# Altium PCB BOARD_2LAYER.PcbDoc (part 5 of 7)
Units mil, origin at the board's own origin, x right, y up, seen from the top; angles counter-clockwise.
Board outline 7677.17 x 7677.17 mil, 2 copper layers (Top Layer, Bottom Layer), stack 34.252 mil thick; 625 components, 375 nets, 1924 pads, 450 vias.
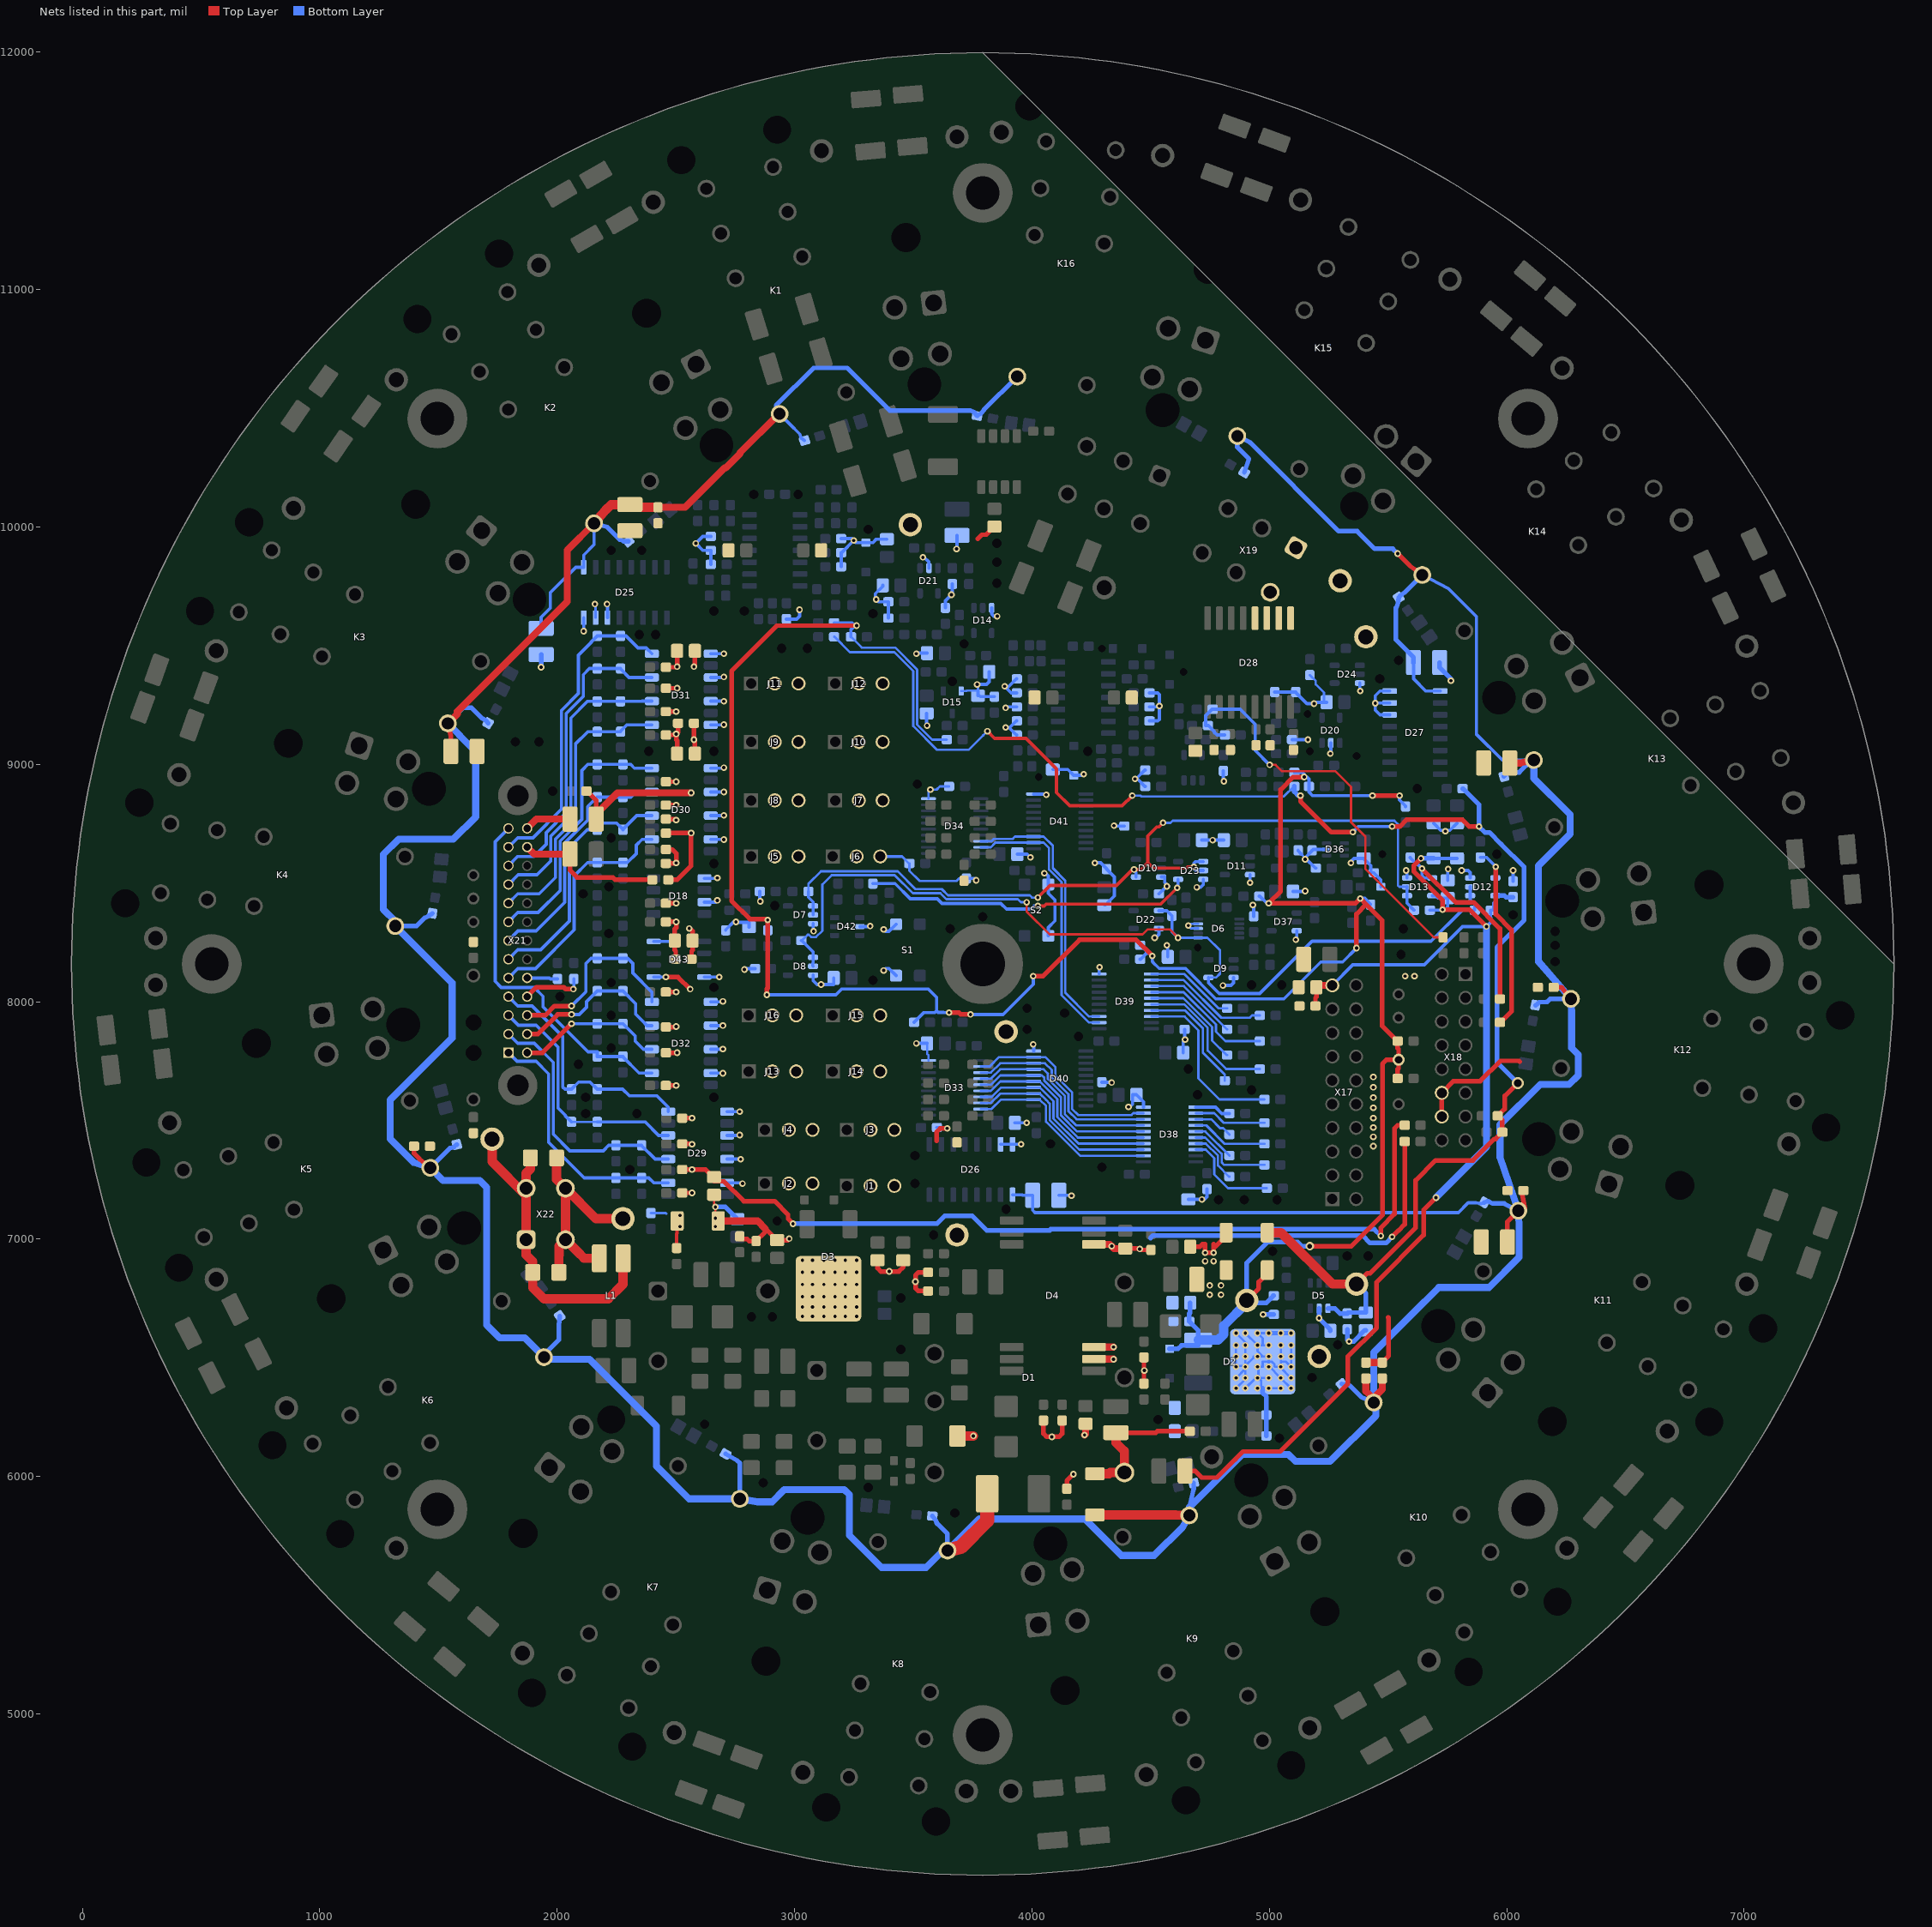
[diagram p5: the nets of this part, all layers, seen from the top]

## Via types
v1: diameter 27.56/27.56 (per signal layer), hole 13.78, Top Layer to Bottom Layer, 447 vias
v2: diameter 78.74, hole 55.12, Top Layer to Bottom Layer, 2 vias
v3: diameter 35.43/35.43 (per signal layer), hole 19.68, Top Layer to Bottom Layer, 1 vias

## Nets (pads, with @x,y where several pads share a name; then routed paths per layer and width w, separated by ;. In a path a pad name is that pad's centre, name@x,y a point inside that pad or via, vN(x,y) a via of type N, cw(c..) or ccw(c..) an arc to the next point about the centre after c; other vN are vias at no path point) (continued)
+5V_COM: C11.2 C50.2 D2.3 FB1.2 FB4.1 FB7.1 FB8.1 FB9.1 FB10.2 FB11.1 FB12.1 FB13.1 FB15.1 FB17.1 FB18.1 KW8.1 R143.2 R168.1 R189.1 TP8.1 V6.2 V13.1 | length 11333.2
  Top Layer w19.68: v1(2883.01,8029.53) 2883.01,8054.13 2886.95,8058.07 v1(2886.95,8344.49) 2886.95,8348.43 2811.08,8348.43 2734.6,8424.9 2734.6,9393.2 2926.05,9584.65 v1(3260.97,9584.65) ; v1(3650.73,7954.72) 3692.07,7954.72 3699.94,7946.85 v1(3741.28,7946.85) ; v1(4005.06,8108.27) 4046.79,8108.27 4200,8261.48 4438.46,8261.48 v1(4507.03,8192.91) ; TP8.1@4904.67,6742.13 4954.89,6792.35 4954.89,6819.91 4991.28,6856.3 V13.1@4991.28,6870.08 ; v1(5146.79,8946.85) 5100.8,8946.85 5047.06,8893.11 5047.06,8465.23 4997.97,8416.13 4997.19,8416.13 v1(4997.19,8415.35) 5360.86,8415.35 5360.9,8415.39 5363.37,8415.39 v1(5383.01,8435.04) 5407.91,8410.14 ; v3(5170.42,6970.47) 5345.4,6970.47 5476.2,7101.27 5476.2,7738.3 5493.8,7755.91 KW8.1@5544.43,7755.91 ; v1(5367.27,8226.38) 5367.27,8369.5 5407.91,8410.14 ; v1(5434.2,8868.11) v1(5548.37,8868.11) ; R189.1@5540.5,7677.17 5540.5,7715.55 5544.43,7719.49 KW8.1@5544.43,7755.91 ; 5407.91,8410.14 5474.4,8343.65 5474.4,7898.77 5538.53,7834.65 R168.1@5540.5,7834.65 5540.5,7804.13 5544.43,7800.2 KW8.1@5544.43,7755.91
  Bottom Layer w9.84: FB18.1@3237.35,9537.4 3282.81,9491.93 3424.16,9491.93 3515.13,9400.97 3515.13,9399.66 3515.89,9398.9 3515.89,9167.8 3579.36,9104.33 FB10.2@3640.89,9104.33
  Bottom Layer w13.78: v1(2883.01,8029.53) 3174.07,8029.53 3198.2,8053.65 3562.86,8053.65 3598.2,8018.31 3598.2,7962.08 ; FB9.1@2886.95,8301.18 v1(2886.95,8344.49) ; FB15.1@3166.48,9596.46 3242.27,9596.46 v1@3254.08,9584.65 ; FB18.1@3237.35,9537.4 3237.35,9567.91 v1@3254.08,9584.65 ; v1(3260.97,9584.65) v1@3254.08,9584.65 ; FB8.1@3503.09,7913.39 3544.43,7954.72 3590.85,7954.72 3598.2,7962.08 ; v1(3650.73,7954.72) 3626.13,7954.72 3625.73,7955.12 3605.16,7955.12 3598.2,7962.08 ; v1(3741.28,7946.85) 3878.2,7946.85 4005.06,8073.71 v1(4005.06,8108.27) ; FB7.1@4455.85,8179.13 4457.82,8179.13 4482.85,8204.17 ; FB1.2@4455.85,8238.19 4457.82,8238.19 4482.85,8213.15 4482.85,8204.17 ; FB11.1@4957.82,8444.88 4959.79,8444.88 4989.31,8415.35 v1(4997.19,8415.35) ; FB13.1@5105.46,8966.54 5137.94,8966.54 5146.79,8957.68 v1(5146.79,8946.85) 5157.62,8946.85 5166.48,8937.99 FB17.1@5166.48,8907.48 5166.48,8884.27 5182.63,8868.11 v1(5434.2,8868.11) ; v1(5367.27,8226.38) 5308.74,8167.85 5216.82,8167.85 5061.32,8012.35 4774.42,8012.35 4646.54,8140.23 4535.57,8140.23 4509.76,8166.04 4509.76,8166.34 4507.03,8169.07 v1(4507.03,8192.91) 4495.78,8204.17 4482.85,8204.17 ; v1(5383.01,8435.04) 5384.43,8436.45 5401.29,8436.45 5426.32,8411.42 FB12.1@5426.32,8409.45 ; v1(5548.37,8868.11) 5548.37,8850.39 5573.96,8824.8 R143.2@5573.96,8822.83
  Bottom Layer w19.68: V6.2@4579.87,6538.39 4615.74,6538.39 4630.06,6552.71 4699.94,6552.71 D2.3@4699.94,6574.8 4699.94,6616.14 C11.2@4662.54,6653.54 4662.54,6686.02 4666.48,6689.96 C50.2@4666.48,6732.28 ; FB4.1@5018.84,6761.81 5016.87,6761.81 4987.35,6732.28 4904.67,6732.28 TP8.1@4904.67,6742.13 4904.67,6899.99 4993.02,6988.35 5119.08,6988.35 5136.95,6970.47 v3(5170.42,6970.47)
  Bottom Layer w39.37: D2.3@4699.94,6574.8 4784.59,6574.8 4808.21,6598.43 4808.21,6635.83 TP8.1@4904.67,6732.28
+5V_IND: C33.2 C35.2 C61.2 C86.1 D12.5 D13.5 H21.1 H22.1 L6.2 R96.2 R97.2 X17.19 | length 4995.3
  Top Layer w19.68: L6.2@4644.83,6023.62 4687.15,6023.62 4715.29,5995.48 4779.37,5995.48 4856.88,6072.99 4889.65,6105.76 5045.35,6105.76 5331.13,6391.54 5331.13,6505.98 5451.61,6626.47 5451.61,6818.74 5650.03,7017.16 5650.03,7123.31 v1(5701.91,7175.2) ; C35.2@5194.04,7982.28 5194.04,8016.73 5197.98,8020.67 C86.1@5197.98,8061.02 ; v1(5638.92,8604.33) 5609.09,8574.5 5609.09,8548.54 5729.47,8428.16 v1(5729.47,8387.8) 5843.64,8387.8 v1(5914.51,8316.93)
  Top Layer w29.53: C86.1@5197.98,8061.02 5205.85,8068.9 X17.19@5265.3,8068.9
  Bottom Layer w13.78: X17.19@5265.3,8068.9 5351.81,8155.41 5652.46,8155.41 5813.56,8316.51 5889.48,8316.51 5889.9,8316.93 v1(5914.51,8316.93) 5932.31,8334.73 5932.31,8355.23 5932.23,8355.32 R96.2@5932.23,8385.83 5945.05,8385.83 5945.05,8416.34 5951.91,8423.2 D12.5@5951.91,8446.85 ; R97.2@5676.32,8385.83 v1@5729.47,8385.83 ; D13.5@5686.16,8446.85 5700.93,8446.85 5710.77,8437.01 C61.2@5751.13,8437.01 5751.13,8400.59 5736.36,8385.83 v1@5729.47,8385.83 ; H22.1@5692.07,8604.33 H21.1@5790.5,8604.33 ; v1(5729.47,8387.8) v1@5729.47,8385.83
  Bottom Layer w19.68: v1(5638.92,8604.33) H22.1@5692.07,8604.33 ; D12.5@5951.91,8446.85 5990.3,8446.85 5996.2,8440.94 C33.2@6026.72,8440.94
  Bottom Layer w29.53: v1(5701.91,7175.2) 5914.51,7387.8 v1(5914.51,8316.93)
+5V_R: C8.2 C21.2 C22.2 C23.2 C24.2 C95.2 C96.2 C97.2 C100.2 C101.2 C102.2 C103.2 D25.9 D26.9 D27.9 K1.A1 K2.A1 K3.A1 K4.A1 K5.A1 K6.A1 K7.A1 K8.A1 K9.A1 K10.A1 K11.A1 K12.A1 K13.A1 K14.A1 K15.A1 K16.A1 L8.2 R85.2 R126.2 R127.2 R128.2 R129.2 R130.2 R131.2 R132.2 R133.2 R134.2 R135.2 R136.2 R137.2 R138.2 R139.2 R140.2 R141.2 V16.1 | length 24526.5
  Top Layer w9.84: K10.A1@5439.63,6311.95 K10.A1@5439.63,6326.51
  Top Layer w19.68: C21.2@1396.79,7391.73 1396.79,7361.22 1420.59,7337.42 K5.A1@1465.29,7300.65 ; K3.A1@1539.4,9172.9 1552.31,9119.09 C102.2@1552.31,9055.12 ; v1(5540.5,9887.8) 5592.64,9835.65 K14.A1@5644.03,9797.89 ; C100.2@6003.09,6988.19 6003.09,7073.85 K11.A1@6049.01,7119.76 6076.96,7129.93 6061.87,7204.72 C24.2@6070.02,7204.72 ; C23.2@6197.98,8061.02 6230.46,8061.02 6234,8057.48 K12.A1@6270.29,8012.39
  Top Layer w29.53: K3.A1@1539.4,9172.9 1579.15,9212.65 1579.15,9222.85 2041.79,9685.49 2041.79,9901.97 K2.A1@2155.12,10015.3 ; C22.2@2424.35,10082.68 2539.37,10082.68 2705.55,10248.86 2710.03,10248.86 2770.01,10308.84 2770.01,10313.32 2932.1,10475.41 K1.A1@2936.84,10476.44 ; R85.2@5406.64,6413.39 5406.64,6359.5 5439.63,6326.51 5439.63,6331.77 5475.53,6367.67 C8.2@5475.53,6413.39 ; C101.2@6012.94,9005.91 6057.59,9005.91 K13.A1@6114.13,9018.25
  Top Layer w39.37: K2.A1@2155.12,10015.3 2205.06,10072.04 2227.5,10094.49 C96.2@2306.24,10094.49 2306.24,10084.65 2304.27,10082.68 C22.2@2424.35,10082.68 ; V16.1@4264.9,5838.58 4604.76,5838.58 K9.A1@4662.6,5836.5
  Top Layer w59.06: K8.A1@3644.15,5688.18 3700.1,5702.97 3811.16,5814.03 L8.2@3811.16,5927.17
  Bottom Layer w13.78: C95.2@1932.23,9572.83 1932.23,9619.99 1970.77,9658.53 1970.77,9723.51 2077.97,9830.71 D25.9@2111.56,9830.71 2111.56,9881.89 2155.12,9925.45 K2.A1@2155.12,10015.3 ; K1.A1@2936.84,10476.44 2977.76,10435.51 3022.28,10390.99 3027.4,10374.77 R126.2@3042.04,10363.95 ; D26.9@3918.25,7187.01 3958.8,7187.01 3960.77,7185.04 C103.2@4003.09,7185.04 4003.09,7121.81 4012.84,7112.06 5796.23,7112.06 5837.75,7153.59 5869.83,7153.59 5891.28,7149.67 R136.2@5905.65,7154.97 ; C97.2@5607.42,9429.13 5607.42,9360.24 5658.8,9308.86 D27.9@5719.63,9308.86 ; K14.A1@5644.03,9797.89 5754.44,9740.84 5872.05,9623.23 5872.05,9127.57 5981.38,9018.25 6104.56,9018.25 K13.A1@6114.13,9018.25
  Bottom Layer w19.68: K4.A1@1317.5,8319.1 1406.75,8319.1 1440.94,8353.29 1456.82,8360.23 R129.2@1473.66,8372.56 ; K5.A1@1465.29,7300.65 1548,7383.36 1564.42,7387.76 R130.2@1576.72,7398.78 ; K3.A1@1539.4,9172.9 1605.49,9238.99 1637.88,9238.99 1682.14,9194.74 1698.46,9185.31 R128.2@1708.8,9173.77 ; K6.A1@1944.12,6503.06 1944.12,6513.66 2006.39,6575.93 2006.39,6638.58 2008.65,6654.35 R131.2@2010.48,6675.34 ; K2.A1@2155.12,10015.3 2210.84,9999.66 2263.44,9947.06 2279.34,9940.15 R127.2@2300.29,9939.12 ; R132.2@2709.24,6095.47 2759,6066.89 2769.49,6056.4 K7.A1@2769.49,5906.06 ; K1.A1@2936.84,10476.44 2922.09,10491.19 2922.09,10512.16 3080.02,10670.09 3221.09,10670.09 3400.44,10490.74 3739.69,10490.74 3755.24,10483.81 R141.2@3769.35,10468.41 3786.93,10479.82 3796.81,10492.26 K16.A1@3938.02,10633.47 ; R133.2@3579.74,5833.7 3593.68,5818.11 3600.18,5802.03 3644.15,5758.06 K8.A1@3644.15,5688.18 ; K9.A1@4662.6,5836.5 4662.6,5870.08 4664.29,5871.77 4677.5,5933.08 4682.13,5950.12 R134.2@4681.09,5973.23 ; R140.2@4894.28,10229.33 4914.1,10287.24 4864.97,10336.36 K15.A1@4864.97,10382.99 4916.86,10357.36 5291.87,9982.34 5369.72,9982.34 5443.39,9908.67 5519.62,9908.67 v1(5540.5,9887.8) ; R135.2@5304.32,6389.62 5325.27,6388.59 5341.17,6381.68 5386.95,6335.91 K10.A1@5439.63,6311.95 ; C97.2@5607.42,9429.13 5607.42,9450.79 5533.07,9525.14 5533.07,9658.89 5535.41,9661.22 5542.2,9681.78 R139.2@5544.92,9702.61 5551.22,9710.7 5569.98,9723.83 K14.A1@5644.03,9797.89 ; R136.2@5905.65,7154.97 5920.03,7160.26 5941.47,7149.87 5990.11,7149.87 5991.87,7148.1 K11.A1@6049.01,7119.76 ; R138.2@5988.53,8949.65 6000.4,8962.23 6016.83,8966.63 6052.94,8966.63 K13.A1@6104.56,9018.25 ; R137.2@6121.11,7985.71 6137.95,7998.04 6169.75,8000.05 6175.69,8004.98 6183.1,8012.39 K12.A1@6270.29,8012.39
  Bottom Layer w29.53: K3.A1@1539.4,9172.9 1587.85,9124.45 1587.85,9122.82 1656.73,9053.93 1656.73,8779.43 1562.52,8685.21 1331.95,8685.21 1267.78,8621.03 1267.78,8388.96 1317.5,8339.24 K4.A1@1317.5,8319.1 1557.01,8079.6 1557.01,7847.21 1296.23,7586.43 1296.23,7422.55 1393.5,7325.27 1393.5,7324.34 K5.A1@1465.29,7300.65 1518.13,7247.8 1673.83,7247.8 1703.05,7218.58 1703.05,6638.31 1757.35,6584.01 1863.17,6584.01 K6.A1@1944.12,6503.06 1945.27,6500.93 1952.17,6494.02 2135.95,6494.02 2417.48,6212.49 2417.48,6043.71 2555.13,5906.06 K7.A1@2769.49,5906.06 2844.05,5893.58 2905.13,5893.58 2956.6,5945.05 3209.34,5945.05 3230.22,5924.17 3230.22,5752.73 3365.91,5617.04 3554.16,5617.04 3625.31,5688.18 K8.A1@3644.15,5688.18 3777.51,5821.54 4222.74,5821.54 4376.35,5667.93 4515.35,5667.93 4633.75,5786.33 K9.A1@4662.6,5836.5 ; K9.A1@4664.29,5871.77 4885.59,6093.07 5080.92,6093.07 5110.15,6063.84 5256.09,6063.84 5448.57,6256.32 5448.57,6303.02 K10.A1@5439.63,6311.95 5439.63,6522.6 5598.48,6681.46 5713.67,6796.64 5925.77,6796.64 6052.57,6923.44 6052.57,7062 K11.A1@6049.01,7119.76 5971.49,7345.03 5971.49,7481.69 6141.5,7651.7 6262.49,7651.7 6301,7690.22 6301,7777.44 6273.34,7805.1 6273.34,7954.6 K12.A1@6270.29,8012.39 6133.77,8168.59 6133.77,8573.02 6267.05,8706.3 6267.05,8789.01 6114.13,8941.92 K13.A1@6114.13,9018.25
+U_COM: C19.2 C20.2 C56.2 C57.2 C79.1 C80.1 D43.8 FB5.2 FB6.1 R108.1 R109.1 R110.1 R111.1 R112.1 R113.1 R114.1 R115.1 R116.1 R117.1 R118.1 R119.1 R120.1 R121.1 R122.1 R123.1 R124.1 R125.1 R144.2 R166.1 V14.1 | length 5115.5
  Top Layer w9.84: V14.1@2505.06,7076.77 2505.06,7088.58 v1(2516.87,7100.39)
  Top Layer w13.78: FB5.2@2503.09,6962.6 2503.09,7022.64 2505.06,7024.61 2505.06,7053.15 v1(2516.87,7053.15)
  Top Layer w19.68: R120.1@2457.82,7647.64 v1(2501.13,7647.64) ; R121.1@2457.82,7785.43 v1(2505.06,7785.43) ; R122.1@2457.82,7893.7 2499.16,7893.7 v1(2501.13,7895.67) ; R123.1@2457.82,8041.34 v1(2501.13,8041.34) ; R124.1@2457.82,8336.61 v1(2501.13,8336.61) 2501.13,8312.01 2495.22,8306.1 C80.1@2495.22,8257.87 2495.22,8217.52 2499.16,8213.58 C19.2@2499.16,8179.13 ; R125.1@2457.82,8415.35 v1(2501.13,8415.35) ; R112.1@2457.82,8582.68 2499.16,8582.68 v1(2501.13,8584.65) 2501.13,8625.33 2484.73,8641.73 FB6.1@2457.82,8641.73 ; R113.1@2457.82,8769.68 2497.19,8769.68 v1(2501.13,8765.75) ; R114.1@2457.82,8828.74 v1(2501.13,8828.74) ; R115.1@2457.82,8927.17 v1(2501.13,8927.17) ; R116.1@2457.82,9124.02 2497.19,9124.02 v1(2501.13,9127.95) ; R117.1@2457.82,9222.44 v1(2501.13,9222.44) ; R118.1@2457.82,9320.87 v1(2505.06,9320.87) ; R119.1@2457.82,9409.45 2503.09,9409.45 v1(2505.06,9411.42) C79.1@2505.06,9478.35 ; C57.2@2505.06,9045.28 2505.06,9099.41 2501.13,9103.35 v1(2501.13,9127.95) ; C20.2@2509,9173.23 2509,9135.83 v1(2501.13,9127.95) ; R108.1@2526.72,7194.88 v1(2568.05,7194.88) ; R109.1@2526.72,7293.31 v1(2568.05,7293.31) 2625.14,7293.31 2656.64,7261.81 C56.2@2660.57,7261.81 2660.57,7243.66 2702.09,7243.66 2785.95,7159.81 2916.24,7159.81 2972.37,7103.68 2972.37,7085.84 v1(2993.25,7064.96) ; R110.1@2526.72,7401.57 2566.09,7401.57 v1(2568.05,7399.61) ; R111.1@2526.72,7509.84 v1(2568.05,7509.84) ; v1(5469.63,7013.78) 5469.63,7048.58 5526.7,7105.65 5526.7,7466.4 5540.62,7480.31 R166.1@5570.02,7480.31
  Bottom Layer w9.84: R144.2@2394.83,7110.24 2456.56,7110.24 2459.35,7107.44
  Bottom Layer w13.78: D43.8@2406.74,8254.23 2488.48,8254.23 2488.53,8254.29
  Bottom Layer w19.68: v1(2993.25,7064.96) 3599.65,7064.96 3632.42,7097.74 3748.71,7097.74 3808.9,7037.55 4075.41,7037.55 4079.4,7041.54 5441.87,7041.54 v1(5469.63,7013.78)
+U_MC: C26.2 R107.1 X21.25 | length 625
  Top Layer w19.68: R107.1@2054.27,8622.05 2054.27,8553.15 2083.64,8523.78 2234.03,8523.78 2244.03,8513.78 C26.2@2400.73,8513.78
  Top Layer w29.53: X21.25@1873.17,8651.57 1902.7,8622.05 R107.1@2054.27,8622.05
+Vin_COM: C66.2 L1.1 R35.2 TP10.1 X22.1 X22.3 | length 1397.7
  Top Layer w39.37: TP10.1@1725.53,7421.26 1725.53,7327.04 X22.3@1869.24,7183.34 ; C66.2@1886.95,7342.52 1886.95,7296.26 1869.24,7278.54 X22.3@1869.24,7214.57 X22.3@1869.24,7183.34 ; L1.1@2277.5,6919.29 2277.5,6810.68 2214.93,6748.11 1944.77,6748.11 1896.79,6796.08 R35.2@1896.79,6860.24 1896.79,6906.5 1869.24,6934.06 X22.1@1869.24,6998.03 X22.3@1869.24,7183.34
-5V_COM: C17.2 C78.1 D5.1 FB14.1 FB16.1 KW7.1 R142.2 R169.1 R190.1 TP9.1 V15.2 | length 6910.8
  Top Layer w13.78: v1(3812.15,9139.76) 3842.38,9109.53 3974.52,9109.53 4103.37,8980.68 4103.37,8881.08 4158.63,8825.82 4380.09,8825.82 v1(4422.39,8868.11)
  Top Layer w19.68: v1(5131.05,8868.11) 5131.05,8844.49 5260.97,8714.57 v1(5351.52,8714.57) ; TP9.1@5367.27,6811.02 5413.2,6856.96 5424.7,6856.96 5616.18,7048.44 5616.18,7247.58 5700.43,7331.82 5857.53,7331.82 5947.98,7422.27 5952.93,7422.27 R190.1@5981.44,7450.79 5981.44,7501.97 5963.72,7519.69 R169.1@5961.76,7519.69 5990.27,7548.2 5992.24,7548.2 5992.24,7603.32 KW7.1@6046.4,7657.48 ; v1(5516.87,8738.19) 5549.22,8738.19 5577.8,8766.76 5813.12,8766.76 5841.7,8738.19 v1(5883.01,8738.19)
  Top Layer w39.37: V15.2@4991.28,7027.56 5049.6,7027.56 5266.14,6811.02 TP9.1@5367.27,6811.02
  Bottom Layer w9.84: FB16.1@3166.48,9537.4 3168.45,9537.4 3233.02,9472.83 3419.69,9472.83 3500.14,9392.38 3500.14,9161.28 3600.19,9061.23 3732.41,9061.23 3793.54,9122.36 3794.75,9122.36 v1(3812.15,9139.76) ; v1(4422.39,8868.11) 4457.18,8868.11 4460.04,8865.26 5061.26,8865.26 5103.49,8907.48 FB14.1@5105.46,8907.48
  Bottom Layer w13.78: v1(5351.52,8714.57) 5375.14,8738.19 v1(5516.87,8738.19)
  Bottom Layer w19.68: FB14.1@5105.46,8907.48 5105.46,8884.69 5122.03,8868.11 v1(5131.05,8868.11) ; D5.1@5247.19,6708.66 5275.73,6708.66 5297.39,6687.01 C17.2@5327.9,6687.01 5331.83,6690.94 C78.1@5406.64,6690.94 5406.64,6771.65 TP9.1@5367.27,6811.02 ; R142.2@5814.12,8897.64 5816.09,8897.64 5883.01,8830.71 v1(5883.01,8738.19) 5907.62,8713.58 5927.06,8713.58 5976.87,8663.77 6072.87,8567.77 6072.87,8343.82 5958.31,8229.27 5958.31,7745.57 KW7.1@6046.4,7657.48
-U_COM: C12.1 C13.1 C15.1 C19.1 C20.1 C25.1 C26.1 C27.1 C52.1 C53.1 C55.1 C56.1 C57.1 C76.2 C79.2 C80.2 D3.4 D4.12 D43.5 H4.2 R87.1 R105.2 R167.1 R186.1 TP28.1 V14.2 | length 6122.1
  Top Layer w9.84: v1(2575.93,9411.42) v1@2579.87,9415.35 ; C56.1@2660.57,7187.01 2660.57,7133.86 v1@2666.48,7127.95 ; v1(2666.48,7088.58) v1@2666.48,7127.95 ; v1(2666.48,7135.83) v1@2666.48,7127.95 ; 2875.14,7041.34 2877.11,7041.34 ; v1(3032.62,6675.2) 3073.96,6716.54 v1(3075.93,6714.57) D3.4@3115.3,6714.57 ; v1(3032.62,6714.57) v1(3075.93,6757.87) D3.4@3109.39,6791.34 ; v1(3032.62,6757.87) D3.4@3066.09,6791.34 ; v1(3032.62,6860.24) v1(3032.62,6809.06) 3050.34,6791.34 D3.4@3066.09,6791.34 ; v1(3032.62,6911.42) v1(3075.93,6911.42) 3094.26,6911.42 3108.72,6896.96 v1(3123.17,6911.42) ; v1(3075.93,6675.2) D3.4@3115.3,6714.57 ; v1(3075.93,6809.06) D3.4@3075.93,6801.18 ; v1(3075.93,6860.24) v1(3123.17,6860.24) D3.4@3142.86,6860.24 ; v1(3123.17,6757.87) D3.4@3142.86,6757.87 ; v1(3170.42,6757.87) D3.4@3142.86,6757.87 ; v1(3170.42,6809.06) D3.4@3170.42,6805.12 ; v1(3170.42,6860.24) D3.4@3142.86,6860.24 ; v1(3213.72,6675.2) v1(3170.42,6675.2) v1(3123.17,6675.2) 3123.17,6700.17 D3.4@3137.57,6714.57 ; v1(3213.72,6757.87) D3.4@3213.72,6761.81 ; v1(3213.72,6860.24) v1(3213.72,6809.06) D3.4@3213.72,6791.34 ; v1(3260.97,6675.2) 3217.66,6718.5 v1(3213.72,6714.57) v1(3170.42,6714.57) 3142.86,6714.57 D3.4@3142.86,6719.85 ; v1(3260.97,6714.57) D3.4@3213.72,6761.81 ; v1(3260.97,6757.87) D3.4@3227.5,6791.34 ; v1(3260.97,6860.24) v1(3260.97,6809.06) 3243.25,6791.34 D3.4@3227.5,6791.34 ; v1(3260.97,6911.42) v1(3213.72,6911.42) v1(3170.42,6911.42) v1(3123.17,6911.42) ; D3.4@3066.09,6791.34 D3.4@3075.93,6801.18 ; D3.4@3075.93,6801.18 3075.93,6791.34 D3.4@3109.39,6791.34 ; D3.4@3109.39,6791.34 D3.4@3123.17,6805.12 ; D3.4@3115.3,6714.57 v1(3123.17,6714.57) D3.4@3137.57,6714.57 ; D3.4@3123.17,6805.12 v1(3123.17,6809.06) 3142.86,6828.74 D3.4@3142.86,6860.24 ; D3.4@3123.17,6805.12 3123.17,6791.34 D3.4@3142.86,6791.34 ; v1(3123.17,6911.42) 3142.86,6891.73 D3.4@3142.86,6860.24 ; D3.4@3137.57,6714.57 D3.4@3142.86,6719.85 ; D3.4@3142.86,6719.85 D3.4@3142.86,6757.87 ; D3.4@3142.86,6757.87 D3.4@3142.86,6791.34 ; D3.4@3142.86,6791.34 3170.42,6791.34 D3.4@3170.42,6805.12 ; D3.4@3170.42,6805.12 D3.4@3184.2,6791.34 ; D3.4@3184.2,6791.34 D3.4@3213.72,6791.34 ; D3.4@3184.2,6791.34 D3.4@3213.72,6761.81 ; D3.4@3213.72,6791.34 D3.4@3227.5,6791.34
  Top Layer w19.68: R186.1@2123.17,8887.8 2125.14,8887.8 2164.51,8848.43 R105.2@2164.51,8791.34 ; v1(2457.82,8104.33) 2509,8104.33 v1(2560.18,8053.15) ; C25.1@2457.82,8710.63 v1(2564.12,8710.63) 2564.12,8572.83 2505.06,8513.78 C26.1@2467.66,8513.78 ; v1(2556.24,8309.06) 2559.2,8309.06 2570.02,8298.23 C80.2@2570.02,8257.87 2570.02,8217.52 2566.09,8213.58 C19.1@2566.09,8179.13 ; C20.1@2575.93,9173.23 v1(2575.93,9104.33) 2579.87,9104.33 C57.1@2579.87,9045.28 ; v1@2579.87,9415.35 C79.2@2579.87,9478.35 ; C27.1@2768.84,7011.81 2768.84,7000.98 2799.35,7000.98 2808.21,6992.13 C15.1@2837.74,6992.13 2874.93,7029.32 2874.93,7041.13 2875.14,7041.34 2877.11,7043.31 2877.11,7041.34 2877.16,7041.28 2881.1,7041.28 C52.1@2926.32,6996.06 2971.6,6996.06 v1(2977.5,7001.97) ; C76.2@3349.55,6911.42 3349.55,6878.09 3363.47,6864.17 v1(3398.76,6864.17) 3439.19,6864.17 3457.82,6882.81 C53.1@3457.82,6911.42 ; R87.1@3562.15,6781.5 3520.81,6781.5 3509,6793.31 v1(3509,6820.87) 3509,6847.69 3521.55,6860.24 C12.1@3562.15,6860.24 ; C55.1@4392.86,6960.63 4448.96,6960.63 v1@4450.93,6958.66 ; v1(4453.88,6958.66) v1@4450.93,6958.66 ; C13.1@4501.13,6954.72 4454.87,6954.72 v1@4450.93,6958.66 ; v1(5516.87,7009.84) 5541.48,7034.45 5542.18,7034.45 5570.02,7062.29 R167.1@5570.02,7411.42
  Top Layer w29.53: R105.2@2164.51,8769.68 2164.51,8791.34 2253.17,8880 2534.34,8880 2534.41,8879.92 v1(2564.12,8879.92) ; v1(2666.48,7053.15) 2666.48,7064.96 V14.2@2678.29,7076.77 ; v1(2666.48,7088.58) V14.2@2678.29,7076.77 ; 2877.11,7043.31 2843.64,7076.77 V14.2@2678.29,7076.77 ; D4.12@4260.97,6978.35 4327.9,6978.35 v1(4335.77,6970.47) 4345.61,6960.63 C55.1@4392.86,6960.63
  Bottom Layer w13.78: D43.5@2406.74,8104.04 2457.52,8104.04 v1(2457.82,8104.33)
  Bottom Layer w19.68: v1(2666.48,7135.83) 2707.82,7135.83 H4.2@2759,7084.65 ; 4498.95,7004.79 4510.1,7015.95 5391.99,7015.95 5423.69,6984.25 5491.28,6984.25 v1(5516.87,7009.84)
-U_MC: R105.1 X21.26 | length 197.4
  Top Layer w29.53: X21.26@1873.17,8730.32 1912.54,8769.69 R105.1@2054.27,8769.68
-Vin_COM: C66.1 L1.2 R35.1 TP5.1 X22.2 X22.4 | length 979.8
  Top Layer w39.37: C66.1@1997.19,7342.52 1997.19,7251.97 X22.4@2034.59,7214.57 ; R35.1@2007.03,6860.24 2007.03,6933.22 2007.28,6933.47 2007.28,6970.72 X22.2@2034.59,6998.03 ; L1.2@2177.5,6919.29 2113.33,6919.29 2085.37,6947.25 X22.2@2034.59,6998.03 ; TP5.1@2276.72,7086.61 2162.54,7086.61 X22.4@2034.59,7214.57 ; X22.2@2034.59,6998.03 X22.4@2034.59,7214.57
BLOCING: D6.1 D8.1 D8.2 D9.4 D12.1 D12.2 D22.1 R82.1 R96.1 R100.1 | length 4037.8
  Top Layer w9.84: v1(3977.5,8419.29) 3977.5,8380.56 4074.32,8283.74 4465.87,8283.74 4487.24,8305.12 4579.87,8305.12 v1(4615.3,8269.68)
  Bottom Layer w9.84: R82.1@3030.65,8257.87 3055.69,8282.91 3059.4,8282.91 3069.67,8272.64 3090.06,8272.64 3116.62,8299.2 3116.62,8494.09 3156.17,8533.64 3421.37,8533.64 3497.72,8457.29 3614.41,8457.29 3639.3,8432.4 3940.19,8432.4 3953.3,8419.29 v1(3977.5,8419.29) ; v1(4615.3,8269.68) 4668.64,8269.68 D6.1@4699.94,8269.69 4738.92,8269.69 4792.12,8216.48 4792.12,8118.75 4775.73,8102.36 D9.4@4743.25,8102.36
  Bottom Layer w13.78: R82.1@3028.68,8257.87 3030.65,8257.87 3077.9,8210.63 D8.1@3077.9,8187.01 3077.9,8164.37 3076.02,8162.49 3076.02,8151.48 D8.2@3077.9,8149.61 ; D22.1@4534.59,8383.86 4568.05,8383.86 R100.1@4589.71,8362.2 4589.71,8295.28 v1(4615.3,8269.68) ; D9.4@4743.25,8102.36 4743.25,8079.68 4788.64,8034.29 4959.82,8034.29 5180.24,8254.71 5680.63,8254.71 5811.75,8385.83 R96.1@5865.3,8385.83 5865.3,8410 5845.61,8429.69 D12.1@5845.61,8446.85 D12.2@5845.61,8484.25
BLOCING_COM: R184.1 X21.17 | length 258.7
  Top Layer w19.68: X21.17@1873.17,8021.65 1912.7,8061.18 2027.34,8061.18 2035.37,8053.15 v1(2068.05,8053.15)
  Bottom Layer w13.78: v1(2068.05,8053.15) 2070.02,8055.12 R184.1@2070.02,8096.46
CHANNEL-1_COM: C117.2 D29.2 R62.2 X21.1 | length 1069.4
  Bottom Layer w13.78: X21.1@1794.43,7785.43 1830.77,7749.09 1911.21,7749.09 1963.91,7696.39 1963.91,7407.73 2113.51,7258.12 2216.43,7258.12 2216.68,7257.87 C117.2@2247.19,7257.87 R62.2@2355.46,7257.87 2385.97,7257.87 2406.64,7237.2 D29.2@2467.66,7237.2
CHANNEL-2_COM: C118.2 D29.4 R63.2 X21.2 | length 1089.2
  Bottom Layer w13.78: X21.2@1794.43,7864.17 1833.37,7825.24 1903.28,7825.24 1983.59,7744.93 1983.59,7442.18 2053.3,7372.47 2193.47,7372.47 2216.68,7395.67 C118.2@2247.19,7395.67 R63.2@2355.46,7395.67 2355.46,7393.7 2411.95,7337.2 D29.4@2467.66,7337.2
CHANNEL-3_COM: C119.2 D29.6 R64.2 X21.3 | length 1033.5
  Bottom Layer w9.84: C119.2@2060.18,7494.09 R64.2@2168.45,7494.09
  Bottom Layer w13.78: X21.3@1794.43,7942.91 1836.72,7900.62 1911.16,7900.62 2003.28,7808.5 2003.28,7552.96 2033.75,7522.49 2033.75,7520.52 C119.2@2060.18,7494.09 ; R64.2@2168.45,7494.09 2370.42,7494.09 2427.31,7437.2 D29.6@2467.66,7437.2
CHANNEL-4_COM: C120.2 D29.8 R65.2 X21.4 | length 1034
  Bottom Layer w13.78: X21.4@1794.43,8021.65 1833.34,7982.75 1894.12,7982.75 2022.96,7853.91 2022.96,7641.63 2032.71,7631.89 C120.2@2060.18,7631.89 2090.13,7661.84 2138.5,7661.84 R65.2@2168.45,7631.89 2275.74,7631.89 2303.58,7604.06 2419.51,7604.06 2467.66,7555.91 D29.8@2467.66,7537.2
CHANNEL-5_COM: C121.2 D30.2 R66.2 X21.5 | length 999.8
  Bottom Layer w13.78: X21.5@1794.43,8100.39 1833.8,8139.76 1908.15,8139.76 2071.28,8302.89 2071.28,8529.83 2128.06,8586.61 C121.2@2168.45,8586.61 R66.2@2276.72,8586.61 2295.55,8586.61 2332.97,8624.03 2332.97,8659.46 2357.57,8684.06 D30.2@2398.76,8684.06
CHANNEL-6_COM: C122.2 D30.4 R67.2 X21.6 | length 1061.3
  Bottom Layer w13.78: X21.6@1794.43,8179.13 1833.8,8218.5 1929.8,8218.5 2051.59,8340.3 2051.59,8649.97 2126.04,8724.41 C122.2@2168.45,8724.41 2168.45,8726.38 2194.87,8752.8 2250.29,8752.8 R67.2@2276.72,8726.38 ; R67.2@2276.72,8724.41 R67.2@2276.72,8726.38 ; D30.4@2398.76,8784.06 2334.39,8784.06 R67.2@2276.72,8726.38
CHANNEL-7_COM: C123.2 D30.6 R68.2 X21.7 | length 1043.5
  Bottom Layer w13.78: X21.7@1794.43,8257.87 1834.54,8297.98 1911.11,8297.98 2031.91,8418.78 2031.91,8668.51 2128,8764.6 2128,8821.76 C123.2@2168.45,8862.2 R68.2@2276.72,8862.2 2309.2,8862.2 2331.05,8884.06 D30.6@2398.76,8884.06
CHANNEL-8_COM: C124.2 D30.8 R69.2 X21.8 | length 1128.4
  Bottom Layer w13.78: X21.8@1794.43,8336.61 1833.74,8375.92 1919.61,8375.92 2012.22,8468.54 2012.22,8676.66 2103.46,8767.9 2103.46,8973.98 2129.48,9000 C124.2@2168.45,9000 R69.2@2276.72,9000 2309.2,9000 2325.14,8984.06 D30.8@2398.76,8984.06
CHANNEL-9_COM: C125.2 D31.2 R70.2 X21.9 | length 1196.5
  Bottom Layer w13.78: X21.9@1794.43,8415.35 1833.8,8454.72 1923.63,8454.72 1992.54,8523.64 1992.54,8684.81 2077.1,8769.38 2077.1,9086.02 2128.87,9137.8 C125.2@2168.45,9137.8 R70.2@2266.87,9137.8 2266.87,9139.76 2293.45,9166.34 D31.2@2398.76,9166.34
CHANNEL-10_COM: C126.2 D31.4 R71.2 X21.10 | length 1227.7
  Bottom Layer w13.78: X21.10@1794.43,8494.09 1835.37,8535.03 1915.1,8535.03 1972.85,8592.78 1972.85,8697.95 2057.39,8782.48 2057.39,9195.47 2127.67,9265.75 C126.2@2168.45,9265.75 R71.2@2266.87,9265.75 2357.82,9265.75 2358.41,9266.34 D31.4@2398.76,9266.34
CHANNEL-11_COM: C127.2 D31.6 R72.2 X21.11 | length 1292
  Bottom Layer w13.78: X21.11@1794.43,8572.83 1833.8,8612.2 1902.35,8612.2 1953.17,8663.03 1953.17,8712.7 2037.7,8797.23 2037.7,9214.37 2109.84,9286.5 2109.84,9377.94 2135.45,9403.54 R72.2@2168.45,9403.54 C127.2@2266.87,9403.54 2266.87,9401.57 2302.11,9366.34 D31.6@2398.76,9366.34
CHANNEL-12_COM: C128.2 D31.8 R73.2 X21.12 | length 1343.6
  Bottom Layer w13.78: X21.12@1794.43,8651.57 1833.8,8690.94 1897.96,8690.94 2018.01,8811 2018.01,9227.08 2089.63,9298.69 2089.63,9460.55 2143.41,9514.34 2143.41,9516.3 R73.2@2168.45,9541.34 C128.2@2266.87,9541.34 2289.93,9541.34 2340.47,9490.8 2374.3,9490.8 D31.8@2398.76,9466.34
CHANNEL-13_COM: C129.2 D32.2 R74.2 X21.13 | length 1526.2
  Bottom Layer w13.78: X21.13@1794.43,8730.32 1740.08,8675.96 1738.5,8674.38 1738.5,8086.18 1764.04,8060.64 1902.75,8060.64 1940.44,8022.95 1940.44,7978.25 2129.78,7788.91 2168.45,7788.91 C129.2@2168.45,7769.69 R74.2@2276.72,7769.69 2276.72,7767.72 2344.63,7699.8 D32.2@2398.76,7699.8
CHANNEL-14_COM: C130.2 D32.4 R75.2 X21.14 | length 633.5
  Top Layer w19.68: X21.14@1873.17,7785.43 1938.13,7785.43 v1(2060.18,7907.48)
  Bottom Layer w13.78: v1(2060.18,7907.48) C130.2@2168.45,7907.48 R75.2@2276.72,7907.48 2328.38,7855.82 2328.38,7834.05 2362.63,7799.8 D32.4@2398.76,7799.8
CHANNEL-15_COM: C131.2 D32.6 R76.2 X21.15 | length 700
  Top Layer w19.68: X21.15@1873.17,7864.17 1919.38,7864.17 2002.06,7946.85 v1(2060.18,7946.85)
  Bottom Layer w13.78: v1(2060.18,7946.85) 2093.2,7946.85 2123.32,7976.97 2123.32,8000.14 C131.2@2168.45,8045.28 R76.2@2276.72,8045.28 2330.47,7991.52 2330.47,7947.93 2335.59,7942.82 2358.32,7920.09 2378.6,7899.8 D32.6@2398.76,7899.8
CHANNEL-16_COM: C132.2 D32.8 R77.2 X21.16 | length 818.1
  Top Layer w19.68: X21.16@1873.17,7942.91 1949.71,7942.91 1988.76,7981.97 2027.18,7981.97 2027.5,7982.28 v1(2060.18,7982.28)
  Bottom Layer w13.78: v1(2060.18,7982.28) 2120.53,8042.63 2120.53,8161.13 2142.47,8183.07 C132.2@2168.45,8183.07 R77.2@2276.72,8183.07 2296.94,8183.07 2318.33,8161.68 2318.33,8121.05 2398.76,8040.62 D32.8@2398.76,7999.8
DELAY: D7.1 D7.2 D10.4 D13.1 D13.2 D23.1 D23.2 R81.1 R97.1 | length 3654.1
  Top Layer w13.78: v1(4024.75,8438.98) 4076.24,8490.47 4355.77,8490.47 4422.39,8557.09 v1(4430.26,8557.09) 4460.05,8557.09 4488.38,8585.41 ; v1(4552.31,8753.94) 4534.91,8736.54 4526.21,8736.54 4488.38,8698.7 4488.38,8585.41 ; v1(4682.23,8568.9) 4657.62,8568.9 4651.72,8563 4510.79,8563 4488.38,8585.41
  Bottom Layer w9.84: R81.1@3058.21,8464.57 3058.21,8496.6 3110.99,8549.38 3434.47,8549.38 3509.16,8474.69 3619.88,8474.69 3646.42,8448.15 3990.97,8448.15 4000.14,8438.98 v1(4024.75,8438.98) ; v1(4552.31,8753.94) 4583.8,8753.94 4592.66,8762.8 4626.39,8762.8 5506.66,8762.78 ; 5506.68,8762.8 5527.07,8762.8 5541.48,8748.38 5541.48,8649.59 5541.64,8649.43 5541.64,8490 5547.39,8484.25 D13.2@5579.87,8484.25
  Bottom Layer w13.78: R81.1@3058.21,8464.57 3058.21,8440.07 3077.9,8420.39 D7.1@3077.9,8403.54 D7.2@3077.9,8366.14 ; v1(4430.26,8557.09) 4430.26,8551.67 4438.13,8543.79 D10.4@4438.13,8525.59 ; D23.2@4721.6,8553.15 4689.12,8553.15 4682.23,8560.04 v1(4682.23,8568.9) 4682.23,8583.66 4689.12,8590.55 D23.1@4721.6,8590.55 ; D13.2@5579.87,8484.25 D13.1@5579.87,8446.85 5579.87,8415.35 R97.1@5609.39,8385.83
DELAY_COM: R183.1 X21.18 | length 129.6
  Bottom Layer w13.78: X21.18@1873.17,8100.39 1966.68,8100.39 1970.61,8096.46 R183.1@2001.13,8096.46
DELAY_WRITE: D23.4 R182.1 | length 1400.6
  Top Layer w13.78: v1(4024.75,8403.54) 4051.32,8403.54 4059.2,8411.42 4542.46,8411.42 v1(4611.36,8480.32)
  Bottom Layer w13.78: R182.1@3329.87,8498.03 3422.91,8498.03 3486.76,8434.19 3601.16,8434.19 3620.66,8414.69 3868.19,8414.69 3892.7,8390.18 3995.75,8390.18 4009.12,8403.54 v1(4024.75,8403.54) ; v1(4611.36,8480.32) 4613.47,8482.43 4613.47,8491.29 4615.3,8493.11 D23.4@4615.3,8515.75
GND: C1.1 C2.1 C3.1 C4.1 C5.1 C6.1 C7.1 C8.1 C9.1 C10.1 C11.1 C14.1 C16.1 C17.1 C18.1 C21.1 C22.1 C23.1 C24.1 C28.1 C29.1 C30.1 C31.1 C32.1 C33.1 C34.1 C35.1 C36.1 C37.1 C38.1 C39.1 C40.1 C41.1 C42.1 C43.1 C44.1 C45.1 C46.1 C47.1 C48.1 C49.1 C50.1 C51.1 C54.1 C58.1 C59.1 C60.1 C61.1 C62.2 C63.2 C65.1 C72.2 C73.2 C74.2 C75.2 C77.2 C78.2 C81.2 C82.2 C83.2 C84.2 C85.2 C86.2 C87.2 C88.2 C89.2 C90.2 C91.2 C92.2 C93.2 C94.2 C95.1 C96.1 C97.1 C98.1 C99.1 C100.1 C101.1 C102.1 C103.1 C108.1 C135.1 C136.2 C137.2 C138.2 C139.1 C140.1 C141.1 D1.5 D2.4 D4.2 D4.3 D5.2 D6.3 D6.4 D7.3 D8.3 D9.3 D10.3 D11.3 D12.3 D13.3 D14.3 D15.2 D18.5 D18.7 D20.2 D21.2 D22.3 D23.3 D24.3 D25.6 D25.7 D25.8 D26.7 D26.8 D27.6 D27.7 D27.8 D29.9 D29.11 D29.13 D29.15 D30.9 D30.11 D30.13 D30.15 D31.9 D31.11 D31.13 D31.15 D32.9 D32.11 D32.13 D32.15 D33.10 D34.10 D36.2 D37.3 D38.10 D39.10 D40.10 D41.10 D42.2 D43.4 H2.1 H3.2 J1.2 J1.3 J2.2 J2.3 J3.2 J3.3 J4.2 J4.3 J5.2 J5.3 J6.2 J6.3 J7.2 J7.3 J8.2 J8.3 J9.2 J9.3 J10.2 J10.3 J11.2 J11.3 J12.2 J12.3 J13.2 J13.3 J14.2 J14.3 J15.2 J15.3 J16.2 J16.3 R85.1 R86.1 R88.1 R106.1 R145.1 R176.1 R177.1 R179.2 R180.2 R185.2 R187.1 R188.1 R191.1 R192.1 R193.2 R194.2 R195.2 R196.2 R197.2 R198.2 R199.2 R200.2 R201.2 R205.1 R206.1 R212.1 R216.1 R218.1 R220.1 R233.1 R239.1 R253.1 R254.1 R257.1 S1.3 S1.4 S2.1 S2.2 TP29.1 TP30.1 TP31.1 TP32.1 V10.1 V11.1 V13.2 V15.1 V16.2 V17.2 X18.12 X18.14 | length 13481.2
  Top Layer w19.68: 3597.91,7414.48 3597.91,7451.11 3613.33,7466.54 v1(3642.86,7466.54) ; 3771.92,9950.62 3772.14,9950.62 3789.07,9967.55 3807.26,9967.55 C91.2@3841.68,10001.97 ; R86.1@4048.37,6236.22 4048.37,6181.24 4062.29,6167.32 v1(4083.8,6167.32) 4113.19,6167.32 4127.11,6181.24 C14.1@4127.11,6236.22 ; C9.1@4146.79,5948.82 4146.79,5982.28 v1(4174.35,6009.84) ; C98.1@4353.49,6185.04 4521.79,6185.04 4527.7,6190.94 C34.1@4664.51,6190.94 ; R257.1@4471.6,6391.73 4471.6,6444.88 v1(4473.57,6446.85) 4471.6,6448.82 C18.1@4471.6,6501.97 ; C49.1@4666.48,6968.5 4707.82,6968.5 4717.66,6978.35 4729.47,6978.35 v1(4729.47,6942.91) v1(4764.9,6942.91) 4764.9,6978.35 4773.76,6969.49 4818.05,7013.78 V15.1@4818.05,7027.56 ; C8.1@5475.53,6480.31 5475.53,6482.28 5502.49,6509.24 5502.49,6669.21 5500.89,6670.81 ; X18.14@5726.32,7516.54 X18.12@5726.32,7616.54 5775.43,7665.65 5888.37,7665.65 5973.91,7751.18 6051.18,7751.18 6054.77,7747.6
  Top Layer w29.53: v1(4221.6,6175.2) 4225.53,6179.13 C54.1@4225.53,6222.44 ; D4.2@4260.97,6494.88 4342.86,6494.88 v1(4343.64,6494.09) ; D4.3@4260.97,6545.28 v1(4343.64,6545.28) ; R85.1@5406.64,6480.31 C8.1@5475.53,6480.31
  Top Layer w39.37: C65.1@3686.16,6171.26 v1(3753.09,6171.26) ; V16.2@4264.9,6011.81 4324.35,6011.81 4329.87,6017.32 D1.5@4389.31,6017.32 4389.31,6106.89 4353.49,6142.72 C98.1@4353.49,6185.04
  Bottom Layer w9.84: v1(2158.61,9675.2) 2161.56,9672.24 D25.7@2161.56,9618.11 ; v1(2209.79,9675.2) v1@2211.56,9673.43 ; 3451.91,8612.2 3481.44,8582.68 R180.2@3483.41,8582.68 3483.41,8552.17 3526.56,8509.01 3682.38,8509.01 3693.05,8519.68 C4.1@3723.57,8519.68 ; C46.1@3558.21,7824.8 3558.21,7780.02 3564.12,7774.11 D33.10@3564.12,7752.95 ; D34.10@3564.12,8855.32 3564.12,8885.83 v1(3571.99,8893.7) 3598.3,8893.7 3612.08,8907.48 C6.1@3650.73,8907.48 ; D15.2@3701.91,9309.06 3723.57,9309.06 3725.39,9310.88 3772.78,9310.88 v1@3772.78,9336.61 ; D6.3@4699.94,8309.06 4668.64,8309.06 4658.61,8319.09 v1(4658.61,8320.87) 4658.61,8324.8 4662.54,8328.74 D6.4@4699.94,8328.74 ; v1(4859.39,6372.05) 4900.73,6413.39 v1(4898.76,6415.35) D2.4@4898.76,6454.72 ; v1(4859.39,6415.35) D2.4@4898.76,6454.72 ; v1(4859.39,6462.6) D2.4@4859.39,6466.54 ; v1(4859.39,6553.15) v1(4859.39,6505.91) D2.4@4859.39,6466.54 ; v1(4859.39,6604.33) 4904.67,6559.06 v1(4898.76,6553.15) v1(4898.76,6505.91) D2.4@4898.76,6466.54 ; v1(4898.76,6372.05) 4942.07,6415.35 v1(4949.94,6415.35) D2.4@4953.88,6415.35 ; v1(4898.76,6604.33) v1(4949.94,6553.15) ; v1(4949.94,6372.05) D2.4@4965.69,6372.05 ; v1(4949.94,6462.6) D2.4@4953.88,6462.6 ; D2.4@4971.6,6372.05 D2.4@4965.69,6372.05 ; v1(4997.19,6372.05) v1(5048.37,6372.05) ; v1(4997.19,6415.35) D2.4@4953.88,6415.35 ; v1(4997.19,6462.6) D2.4@4997.19,6466.54 ; v1(4997.19,6553.15) D2.4@4971.6,6553.15 ; v1(4997.19,6604.33) v1(4949.94,6604.33) 4971.6,6582.68 D2.4@4971.6,6553.15 ; v1(5048.37,6553.15) v1(5048.37,6505.91) D2.4@5048.37,6484.25 ; v1(5091.68,6372.05) v1(5048.37,6415.35) D2.4@4997.19,6466.54 ; v1(5091.68,6415.35) 5046.4,6460.63 v1(5048.37,6462.6) ; v1(5091.68,6553.15) v1(5091.68,6505.91) v1(5091.68,6462.6) 5070.02,6484.25 D2.4@5048.37,6484.25 ; C135.1@5136.37,8620.66 v1@5150.73,8606.3 ; C41.1@5170.42,9375.98 5195.45,9350.95 5195.45,9336.64 5229.93,9302.17 C92.2@5229.93,9261.81 ; D2.4@4859.39,6466.54 D2.4@4898.76,6466.54 ; D2.4@4898.76,6454.72 v1(4898.76,6462.6) D2.4@4898.76,6466.54 ; D2.4@4898.76,6466.54 4934.2,6501.97 4934.2,6505.91 v1(4949.94,6505.91) D2.4@4971.6,6505.91 ; v1(4949.94,6553.15) D2.4@4971.6,6553.15 ; v1(4949.94,6553.15) 4949.94,6528.18 4971.6,6506.52 D2.4@4971.6,6505.91 ; D2.4@4953.88,6415.35 4965.69,6403.54 D2.4@4965.69,6372.05 ; D2.4@4953.88,6415.35 D2.4@4953.88,6462.6 ; D2.4@4953.88,6462.6 4971.6,6462.6 D2.4@4971.6,6484.25 D2.4@4997.19,6484.25 ; D2.4@4971.6,6505.91 v1(4997.19,6505.91) D2.4@4997.19,6484.25 ; D2.4@4997.19,6466.54 D2.4@4997.19,6484.25 ; D2.4@4997.19,6484.25 5010.33,6484.25 5021.79,6472.79 5021.79,6464.57 5023.76,6462.6 v1(5048.37,6462.6) ; v1(5048.37,6462.6) D2.4@5048.37,6484.25
  Bottom Layer w13.78: v1(2111.36,9561.02) 2111.56,9561.22 D25.8@2111.56,9618.11 ; D25.6@2211.56,9618.11 v1@2211.56,9673.43 ; D43.4@2619.33,8104.23 2682.13,8104.23 v1(2682.23,8104.33) ; D18.7@2620.42,8419.88 2667.07,8419.88 v1(2674.35,8427.17) ; D18.5@2620.42,8519.88 2672.58,8519.88 v1(2674.35,8521.65) ; D32.15@2646.79,7699.8 2696.99,7699.8 v1(2697.98,7698.82) ; D32.13@2646.79,7799.8 2696.6,7799.8 v1(2697.98,7801.18) ; D32.11@2646.79,7899.8 2697.78,7899.8 v1(2697.98,7899.61) ; D32.9@2646.79,7999.8 2695.81,7999.8 v1(2697.98,8001.97) ; D30.15@2646.79,8684.06 2700.93,8684.06 v1(2701.91,8683.07) ; D30.13@2646.79,8784.06 2700.53,8784.06 v1(2701.91,8785.43) ; D30.11@2646.79,8884.06 2701.72,8884.06 v1(2701.91,8883.86) ; D30.9@2646.79,8984.06 2699.75,8984.06 v1(2701.91,8986.22) ; D31.15@2646.79,9166.34 2700.93,9166.34 v1(2701.91,9167.32) ; D31.13@2646.79,9266.34 2701.32,9266.34 v1(2701.91,9265.75) ; D31.11@2646.79,9366.34 2700.14,9366.34 v1(2701.91,9368.11) ; D31.9@2646.79,9466.34 2701.72,9466.34 v1(2701.91,9466.54) ; R197.2@2646.79,9842.52 C40.1@2646.79,9901.57 2613.33,9901.57 v1(2583.8,9931.1) 2613.33,9960.63 R198.2@2646.79,9960.63 ; C1.1@2709.79,8301.18 2709.79,8303.15 2743.25,8336.61 v1(2753.09,8336.61) 2755.3,8334.41 2808.21,8334.41 C72.2@2808.21,8314.96 ; D29.15@2715.69,7237.2 2777.7,7237.2 v1(2780.65,7234.25) ; D29.13@2715.69,7337.2 2772.19,7337.2 v1(2772.78,7336.61) ; D29.11@2715.69,7437.2 2767.07,7437.2 v1(2768.84,7438.98) ; D29.9@2715.69,7537.2 2768.64,7537.2 v1(2768.84,7537.4) ; v1(2788.53,8135.83) 2792.46,8139.76 C2.1@2833.8,8139.76 ; C3.1@2853.49,8464.57 2853.49,8425.2 v1(2855.46,8423.23) ; R216.1@2965.69,9612.2 3009.14,9612.2 3020.81,9623.88 v1(3020.81,9651.57) ; D8.3@3077.9,8112.2 3077.9,8089.57 3094.63,8072.83 v1(3111.36,8072.83) 3115.3,8068.9 3119.07,8072.67 3164.51,8072.67 C45.1@3164.51,8100.39 ; D7.3@3077.9,8328.74 3077.9,8299.21 v1(3079.87,8297.24) ; R220.1@3196.01,9832.68 C39.1@3196.01,9891.73 3197.98,9891.73 v1(3249.16,9942.91) ; R196.2@3196.01,9950.79 3241.28,9950.79 v1(3249.16,9942.91) ; D42.2@3274.75,8316.93 3316.09,8316.93 v1(3318.05,8318.9) ; J6.3@3360.97,8612.2 3451.91,8612.2 ; C93.2@3371.2,9753.94 3371.2,9750 3340.26,9719.06 3340.26,9698.26 v1(3343.64,9694.88) 3353.49,9685.04 R206.1@3394.83,9685.04 C138.2@3394.83,9616.14 ; v1(3375.14,8131.89) 3383.84,8140.59 3397.15,8140.59 S1.3@3427.5,8110.24 ; v1(3375.14,8305.12) 3383.84,8296.42 3397.15,8296.42 S1.4@3427.5,8326.77 ; C140.1@3388.92,9948.82 3344.63,9948.82 3329.87,9934.06 V11.1@3300.34,9934.06 3258.01,9934.06 v1(3249.16,9942.91) ; v1(3512.94,7824.8) C46.1@3558.21,7824.8 ; v1(3512.94,9466.54) 3514.9,9468.5 C82.2@3558.21,9468.5 ; v1(3540.5,9872.05) 3545.94,9872.05 3566.09,9851.9 D21.2@3566.09,9826.77 ; C83.2@3556.24,9214.57 3556.24,9165.35 v1(3558.21,9163.39) ; R179.2@3599.55,7470.47 3638.92,7470.47 v1(3642.86,7466.54) ; C42.1@3634.98,9659.45 3634.98,9688.98 v1(3660.57,9714.57) 3664.51,9718.5 R254.1@3664.51,9759.84 ; v1(3682.23,9907.48) 3684.2,9909.45 R239.1@3684.2,9964.57 ; C4.1@3723.57,8519.68 3757.03,8519.68 v1(3764.9,8511.81) ; v1(3768.84,9336.61) 3772.78,9336.61 3809.2,9336.61 3820.02,9347.44 C81.2@3820.02,9389.76 ; C58.1@3772.78,9310.88 C58.1@3772.78,9289.37 3779.17,9289.37 3783.11,9285.43 C28.1@3841.68,9285.43 ; D14.3@3829.87,9659.45 3829.87,9633.94 3839.61,9624.2 3853.3,9624.2 v1(3853.49,9624.02) ; D26.7@3868.25,7399.61 D26.8@3918.25,7399.61 v1(3953.88,7399.61) ; v1(3884.98,9328.74) v1@3893.84,9319.88 ; v1(3888.92,9155.51) 3902.7,9155.51 ; v1(3888.92,9238.19) 3892.86,9242.13 C37.1@3936.16,9242.13 ; C73.2@3928.29,7490.16 v1(3977.5,7490.16) ; R212.1@3936.16,9124.02 3934.2,9124.02 3902.7,9155.51 ; R218.1@3936.16,9183.07 3934.2,9183.07 3906.64,9155.51 3902.7,9155.51 ; C108.1@3936.16,9301.18 3912.54,9301.18 v1@3893.84,9319.88 ; R233.1@3936.16,9360.24 3934.2,9360.24 v1@3893.84,9319.88 ; C74.2@3938.13,8622.05 3979.47,8622.05 v1(3993.25,8608.27) ; v1(4005.06,7820.87) 4007.03,7818.9 D40.10@4007.03,7792.32 ; D41.10@4007.03,8875 4057.23,8875 v1(4060.18,8872.05) ; v1(4052.31,8541.34) 4057.42,8541.34 4068.84,8529.92 S2.1@4068.84,8494.09 4068.84,8456.3 4096.61,8428.53 4096.61,8341.16 4068.84,8313.39 S2.2@4068.84,8277.56 ; C139.1@4087.74,8978.35 4150.73,8978.35 4175.34,8953.74 V10.1@4176.32,8953.74 4212.74,8953.74 v1(4217.66,8958.66) ; C103.1@4113.33,7185.04 4164.51,7185.04 v1(4166.48,7183.07) ; v1(4264.9,8584.65) 4266.32,8586.06 4289.08,8586.06 4314.12,8561.02 R177.1@4314.12,8559.06 4346.6,8526.57 4346.6,8445.87 4308.21,8407.48 C47.1@4304.27,8407.48 ; D39.10@4282.62,8117.13 4282.62,8143.7 v1(4284.59,8145.67) ; R176.1@4294.43,7661.42 4333.8,7661.42 v1(4335.77,7659.45) ; v1(4345.61,8742.13) 4347.58,8740.16 C30.1@4388.92,8740.16 ; v1(4406.64,7557.09) 4412.75,7557.09 4423.58,7567.91 4423.58,7608.27 C48.1@4440.1,7608.27 4469.63,7578.74 D38.10@4469.63,7556.1 ; v1(4434.2,8938.98) v1@4438.13,8938.98 ; R195.2@4477.5,8907.48 4475.53,8907.48 4444.04,8938.98 v1@4438.13,8938.98 ; C44.1@4477.5,8976.38 4475.53,8976.38 v1@4438.13,8938.98 ; R194.2@4495.22,9183.07 4530.32,9183.07 4536.56,9189.31 v1@4536.56,9242.13 ; C36.1@4495.22,9242.13 v1@4536.56,9242.13 ; R193.2@4495.22,9301.18 4529.67,9301.18 4536.56,9294.29 v1(4536.56,9246.06) v1@4536.56,9242.13 ; v1(4516.87,8269.68) 4519.83,8269.68 4534.59,8284.45 D22.3@4534.59,8309.06 ; C32.1@4534.59,8454.72 4559.62,8479.76 4561.59,8479.76 v1(4568.05,8486.22) 4575.93,8486.22 4559.2,8502.95 4559.2,8525.59 D10.3@4544.43,8525.59 ; v1(4568.05,8238.19) 4571.99,8234.25 C84.2@4571.99,8188.98 ; C62.2@4636.95,7785.43 4636.95,7832.68 v1(4644.83,7840.55) 4642.86,7842.52 R188.1@4642.86,7883.86 ; C63.2@4658.61,7167.32 v1(4715.69,7167.32) 4726.52,7167.32 4737.35,7178.15 R187.1@4737.35,7210.63 ; v1(4694.04,8482.28) 4710.77,8482.28 4721.6,8493.11 D23.3@4721.6,8515.75 ; C85.2@4715.69,8681.1 v1(4760.97,8681.1) C59.1@4808.21,8681.1 ; v1(4804.27,8068.9) 4838.72,8068.9 4849.55,8079.72 D9.3@4849.55,8102.36 ; C43.1@4806.24,8972.44 4806.24,8931.1 v1(4808.21,8929.13) ; v1(4918.45,8501.97) D11.3@4918.45,8535.43 ; v1(4930.26,8407.48) 4934.2,8403.54 C29.1@4934.2,8360.24 ; C137.2@5022.78,9305.12 R205.1@5111.36,9305.12 5111.36,9303.15 5158.61,9255.91 v1(5188.13,9255.91) 5194.04,9261.81 5229.93,9261.81 C92.2@5241.28,9261.81 ; R253.1@5095.61,9104.33 v1(5162.54,9104.33) ; C60.1@5099.55,8464.57 5148.76,8464.57 v1(5150.73,8466.54) ; v1(5111.36,8261.81) 5115.3,8265.75 D37.3@5115.3,8299.21 ; C135.1@5121.2,8637.8 5121.2,8635.83 C135.1@5136.37,8620.66 ; R185.2@5196.01,8562.99 5194.04,8562.99 5156.64,8600.39 v1(5150.73,8600.39) 5150.73,8606.3 5180.26,8635.83 R145.1@5180.26,8637.8 5184.2,8641.73 D36.2@5241.28,8641.73 ; v1(5257.03,9045.28) 5259,9047.24 D20.2@5259,9090.55 ; v1(5343.64,8584.65) 5343.64,8591.54 5356.44,8604.33 C141.1@5396.79,8604.33 5427.31,8573.82 5427.31,8543.31 C31.1@5440.1,8543.31 5469.63,8513.78 V17.2@5469.63,8484.25 ; D24.3@5381.05,9342.52 5381.05,9311.02 v1(5383.01,9309.06) ; D27.6@5507.03,9208.86 5465.69,9208.86 5446.01,9228.54 v1(5446.01,9257.87) ; D27.7@5507.03,9258.86 5446.99,9258.86 v1(5446.01,9257.87) ; D27.8@5507.03,9308.86 5465.69,9308.86 5446.01,9289.17 v1(5446.01,9257.87) ; v1(5575.93,8553.15) 5579.87,8549.21 D13.3@5579.87,8521.65 ; H3.2@5692.07,8751.97 5722.06,8721.97 v1@5741.28,8721.97 ; v1(5741.28,8718.5) v1@5741.28,8721.97 ; C61.1@5751.13,8511.81 5751.13,8557.09 v1(5753.09,8559.06) ; H2.1@5790.5,8751.97 5760.5,8721.97 v1@5741.28,8721.97 ; v1(5810.18,8553.15) 5836.76,8553.15 5845.61,8544.29 D12.3@5845.61,8521.65 ; C33.1@6026.72,8507.87 v1(6026.72,8553.15)
  Bottom Layer w19.68: v1(1932.23,9409.45) C95.1@1932.23,9462.6 ; D2.4@4971.6,6372.05 4971.6,6351.94 4987.35,6336.19 C10.1@4987.35,6259.84 R88.1@4987.35,6171.26 ; v1(4973.57,6683.07) C16.1@5018.84,6683.07 ; v1(4997.19,6604.33) v1(5048.37,6604.33) v1(5091.68,6604.33) ; D5.2@5209.79,6708.66 v1(5209.79,6667.32) 5209.79,6665.35 5257.03,6618.11 C77.2@5257.03,6614.17 ; C17.1@5327.9,6620.08 5327.9,6576.77 v1(5335.77,6568.9) 5355.46,6568.9 5402.7,6616.14 C78.2@5406.64,6616.14 ; C97.1@5717.66,9429.13 5717.66,9407.48 5764.9,9360.24 v1(5764.9,9352.36)
  other v1: 4749.16,6765.75 4796.4,6765.75 4749.16,6805.12 4796.4,6805.12 4729.47,6907.48 4764.9,6907.48 5438.13,7391.73 5438.13,7431.1 5438.13,7470.47 5438.13,7509.84 5438.13,7553.15 5438.13,7596.46 5438.13,7639.76 5438.13,7683.07 5571.99,8108.27 5611.36,8108.27
I_SUM_COM: C110.2 R171.1 R173.1 R226.1 | length 1781.5
  Top Layer w9.84: v1(5001.13,8998.03) 5025.73,8998.03 5052.07,8971.7 5277.83,8971.7 5344.35,8905.18 5344.35,8756.53 5404.05,8696.83 5404.05,8560.19 5692.58,8271.65 R171.1@5731.44,8271.65
  Bottom Layer w13.78: R173.1@4812.15,9124.02 4779.67,9124.02 4768.29,9135.4 4768.29,9138.35 4743.25,9163.39 R226.1@4741.28,9163.39 4731.44,9163.39 4731.44,9204.72 4759,9232.28 C110.2@4760.97,9232.28 4793.45,9232.28 4793.61,9232.45 4877.33,9232.45 4940.6,9169.17 4940.6,9058.55 v1(5001.13,8998.03)
IN_COM: D28.1 D28.2 D28.3 D28.4 TP34.1 X19.1 X19.4
IND-CH-1: D38.18 R150.1 | length 406.8
  Bottom Layer w9.84: D38.18@4690.1,7376.97 4732.42,7376.97 4767.86,7341.54 4767.86,7272.67 4825.96,7214.57 R150.1@4989.31,7214.57
IND-CH-2: D38.17 R158.1 | length 223.4
  Bottom Layer w9.84: D38.17@4690.1,7402.56 4732.42,7402.56 4783.61,7351.38 4783.61,7310.04 4829.87,7263.78 R158.1@4831.83,7263.78
IND-CH-3: D38.16 R151.1 | length 358.2
  Bottom Layer w9.84: D38.16@4690.1,7428.15 4730.19,7428.15 4796.69,7361.65 4799.35,7358.98 4799.35,7322.96 4809.32,7312.99 R151.1@4979.47,7312.99
IND-CH-4: D38.15 R159.1 | length 183.7
  Bottom Layer w9.84: D38.15@4690.1,7453.74 4730.46,7453.74 R159.1@4831.83,7352.36
IND-CH-5: D38.14 R152.1 | length 321.6
  Bottom Layer w9.84: D38.14@4690.1,7479.33 4734.35,7479.33 4812.1,7401.57 R152.1@4979.47,7401.57
IND-CH-6: D38.13 R160.1 | length 168.2
  Bottom Layer w9.84: D38.13@4690.1,7504.92 4754.64,7504.92 4792.19,7467.37 4805.41,7467.37 R160.1@4831.83,7440.94
IND-CH-7: D38.12 R153.1 | length 306.1
  Bottom Layer w9.84: D38.12@4690.1,7530.51 4767.86,7530.51 4808.21,7490.16 R153.1@4979.47,7490.16
IND-CH-8: D38.11 R161.1 | length 152.7
  Bottom Layer w13.78: D38.11@4690.1,7556.1 4732.42,7556.1 4732.52,7556.01 4772.87,7556.01 4799.35,7529.53 R161.1@4831.83,7529.53
IND-CH-9: D39.18 R154.1 | length 739.7
  Bottom Layer w9.84: D39.18@4503.09,7937.99 4643.19,7937.99 4701.29,7879.89 4701.29,7677.51 4790.22,7588.58 R154.1@4979.47,7588.58
IND-CH-10: D39.17 R162.1 | length 507
  Bottom Layer w9.84: D39.17@4503.09,7963.58 4644.33,7963.58 4720.26,7887.66 4720.26,7784.63 4812.15,7692.74 R162.1@4812.15,7667.32
IND-CH-11: D39.16 R155.1 | length 625.8
  Bottom Layer w9.84: D39.16@4503.09,7989.17 4641.02,7989.17 4740,7890.19 4740,7794.28 4817.75,7716.54 R155.1@4959.79,7716.54
IND-CH-12: D39.15 R163.1 | length 451.3
  Bottom Layer w9.84: D39.15@4503.09,8014.76 4637.7,8014.76 4758.92,7893.54 4758.92,7836.69 4820.02,7775.59 R163.1@4821.99,7775.59
IND-CH-13: D39.14 R156.1 | length 559.4
  Bottom Layer w9.84: D39.14@4503.09,8040.35 4638.57,8040.35 4774.67,7904.26 4774.67,7874.44 4814.46,7834.65 R156.1@4959.79,7834.65
IND-CH-14: D39.13 R164.1 | length 394.3
  Bottom Layer w9.84: D39.13@4503.09,8065.94 4639.9,8065.94 R164.1@4821.99,7883.86
IND-CH-15: D39.12 R157.1 | length 526.7
  Bottom Layer w9.84: D39.12@4503.09,8091.54 4638.88,8091.54 4797.75,7932.67 4917.06,7932.67 4927.31,7942.91 R157.1@4959.79,7942.91
IND-CH-16: D39.11 R165.1 | length 378.8
  Bottom Layer w9.84: D39.11@4503.09,8117.13 4641.78,8117.13 4786.47,7972.44 R165.1@4821.99,7972.44
IND_BLOCING: D12.4 R146.2 R149.1 | length 834.3
  Top Layer w19.68: v1(5953.88,8568.9) 5953.88,8368.2 6019.7,8302.38 6019.7,7959.52 5973.57,7913.39 R149.1@5971.6,7913.39
  Bottom Layer w13.78: R146.2@5888.92,8608.27 5914.51,8608.27 v1(5953.88,8568.9) 5953.88,8544.29 5951.91,8544.29 D12.4@5951.91,8521.65
IND_DELAY: D13.4 R147.2 R148.2 | length 875.8
  Top Layer w19.68: v1(5642.86,8561.02) 5785.04,8418.84 5860.47,8418.84 5971.6,8307.72 R148.2@5971.6,8011.81
  Bottom Layer w13.78: R147.2@5593.64,8608.27 5593.64,8606.3 5621.52,8578.42 5625.46,8578.42 v1(5642.86,8561.02) 5642.86,8532.48 5653.68,8521.65 D13.4@5686.16,8521.65
ON-CH-1: D33.19 D38.2 D40.2 | length 837.9
  Bottom Layer w9.84: D33.19@3784.59,7548.23 3829.42,7548.23 3868.79,7587.6 D40.2@4007.03,7587.6 4032.83,7587.6 4059.2,7561.23 4059.2,7495.09 4202.9,7351.38 D38.2@4469.63,7351.38
ON-CH-2: D33.18 D38.3 D40.3 | length 839.9
  Bottom Layer w9.84: D33.18@3784.59,7573.82 3826.91,7573.82 3866.28,7613.19 D40.3@4007.03,7613.19 4032.83,7613.19 4059.2,7586.82 4059.2,7586.6 4074.94,7570.85 4074.94,7501.61 4199.58,7376.97 D38.3@4469.63,7376.97
ON-CH-3: D33.17 D38.4 D40.4 | length 841.8
  Bottom Layer w9.84: D33.17@3784.59,7599.41 3830.23,7599.41 3869.6,7638.78 D40.4@4007.03,7638.78 4032.83,7638.78 4090.69,7580.92 4090.69,7508.13 4196.27,7402.56 D38.4@4469.63,7402.56
ON-CH-4: D33.16 D38.5 D40.5 | length 843.8
  Bottom Layer w9.84: D33.16@3784.59,7625 3826.91,7625 3866.28,7664.37 D40.5@4007.03,7664.37 4032.83,7664.37 4106.44,7590.76 4106.44,7514.66 4192.95,7428.15 D38.5@4469.63,7428.15
ON-CH-5: D33.15 D38.6 D40.6 | length 850.9
  Bottom Layer w9.84: D33.15@3784.59,7650.59 3826.91,7650.59 3866.28,7689.96 D40.6@4007.03,7689.96 4041.69,7689.96 4051.62,7680.03 4051.62,7668.31 4122.19,7597.74 4122.19,7521.18 4189.63,7453.74 D38.6@4469.63,7453.74
ON-CH-6: D33.14 D38.7 D40.7 | length 857.3
  Bottom Layer w9.84: D33.14@3784.59,7676.18 3826.91,7676.18 3866.28,7715.55 D40.7@4007.03,7715.55 4049.35,7715.55 4067.37,7697.54 4067.37,7674.83 4137.94,7604.26 4137.94,7527.7 4186.31,7479.33 D38.7@4469.63,7479.33
ON-CH-7: D33.13 D38.8 D40.8 | length 859.7
  Bottom Layer w9.84: D33.13@3784.59,7701.77 3826.91,7701.77 3866.28,7741.14 D40.8@4007.03,7741.14 4054.81,7741.14 4083.11,7712.84 4083.11,7681.36 4153.68,7610.79 4153.68,7539.02 4187.78,7504.92 D38.8@4469.63,7504.92
ON-CH-8: D33.12 D38.9 D40.9 | length 867.3
  Bottom Layer w9.84: D33.12@3784.59,7727.36 3822.16,7727.36 3861.53,7766.73 D40.9@4007.03,7766.73 4056.02,7766.73 4098.86,7723.89 4098.86,7687.88 4169.43,7617.31 4169.43,7547.84 4194.32,7522.95 4419.74,7522.95 4427.31,7530.51 D38.9@4469.63,7530.51
ON-CH-9: D34.19 D39.2 D41.2 | length 1152.7
  Bottom Layer w9.84: D34.19@3784.59,8650.59 3826.91,8650.59 3826.91,8651.45 3845.74,8670.28 D41.2@4007.03,8670.28 4049.35,8670.28 4071.94,8647.68 4071.94,8556.5 4124.48,8503.96 4124.48,8028.22 4240.3,7912.4 D39.2@4282.62,7912.4
ON-CH-10: D34.18 D39.3 D41.3 | length 1152.2
  Bottom Layer w9.84: D34.18@3784.59,8676.18 3829.38,8676.18 3839.22,8686.02 3918.2,8686.02 3928.05,8695.87 D41.3@4007.03,8695.87 4049.35,8695.87 4087.69,8657.53 4087.69,8563.02 4140.23,8510.48 4140.23,8038.06 4240.3,7937.99 D39.3@4282.62,7937.99